# Altium PCB SOM_PCB.PcbDoc (part 3 of 5)
Units mil, origin at the board's own origin, x right, y up, seen from the top; angles counter-clockwise.
Board outline 6000 x 4000 mil, 8 copper layers (Top Layer, Int1 (Sign), Int2 (GND), Int3 (Sign), Int4 (Sign), Int5 (PWR), Int6 (Sign), Bottom Layer), stack 60.424 mil thick; 76 components, 194 nets, 972 pads, 571 vias.
Unrouted connection lines stored in the file: 54.
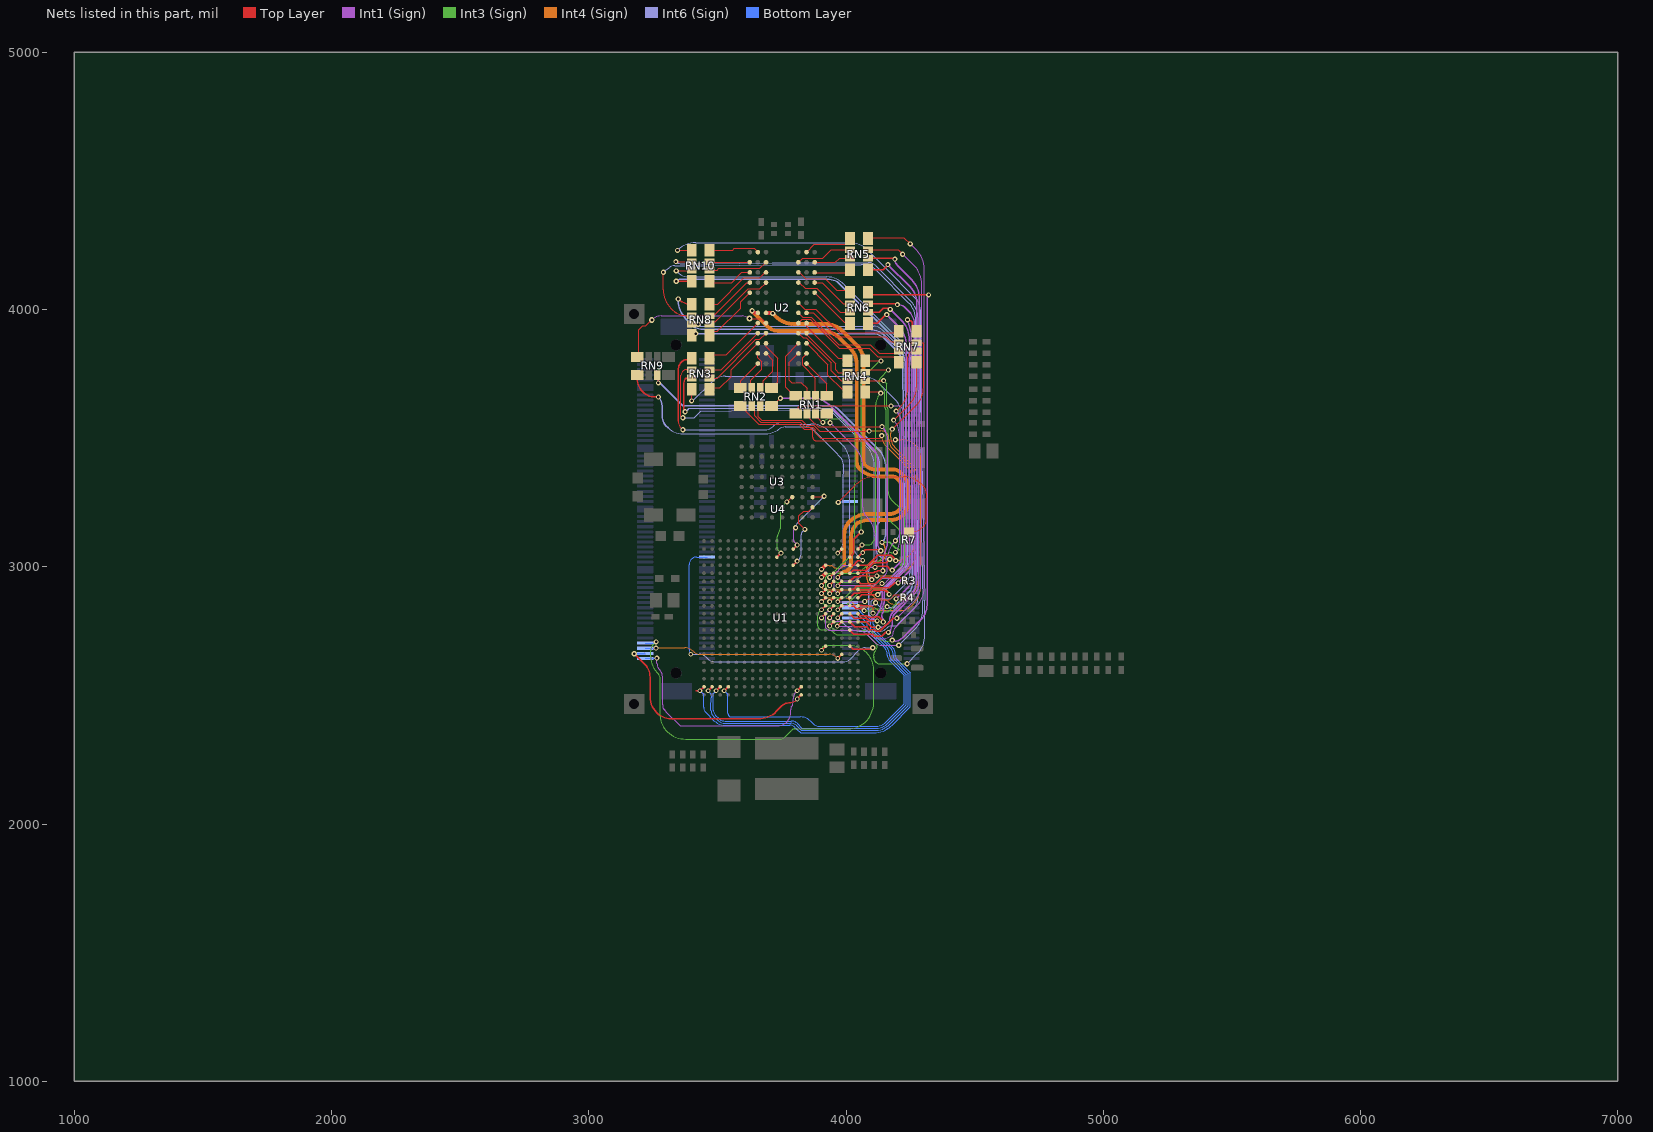
[diagram p8: the nets of this part, all layers, seen from the top]

## Via types
v1: diameter 19, hole 10, Top Layer to Bottom Layer, 330 vias
v2: diameter 20, hole 10, Top Layer to Bottom Layer, 235 vias
v3: diameter 23, hole 11.81, Top Layer to Bottom Layer, 6 vias

## Nets (pads, with @x,y where several pads share a name; then routed paths per layer and width w, separated by ;. In a path a pad name is that pad's centre, name@x,y a point inside that pad or via, vN(x,y) a via of type N, cw(c..) or ccw(c..) an arc to the next point about the centre after c; other vN are vias at no path point) (continued)
A\O\E\: U1.C10 U3.F6 | length 267.8
  Top Layer w4: v2(3770.25,3252) 3772.82,3255 3788.44,3270.63 U3.F6@3791.26,3270.63
  Top Layer w5: U1.C10@3731.5,3037.48 v1(3747.24,3053.23)
  Int3 (Sign) w3: 3741.65,3140 3734.24,3121.4 ccw(c3747.24,3116.22) 3733.25,3116.49 3732.37,3071 3732.37,3068.1 v1(3747.24,3053.23)
  Int3 (Sign) w4: 3741.65,3140 3744.85,3148.05 ccw(c3730,3154) 3745.99,3153.32 3746,3153.64 3746,3220 cw(c3767.11,3220) 3752.17,3234.92 cw(c3755.02,3232.11) 3752.28,3235.02 v2(3770.25,3252)
A\R\E\: U1.B12 U3.F8 | length 312
  Top Layer w4: U3.F8@3870,3270.63 3871.93,3272.56 3913.56,3272.56 v2(3915,3274)
  Top Layer w5: U1.B12@3794.49,3068.98 v1(3810.24,3084.72)
  Int1 (Sign) w3: 3796.24,3140 3796.24,3098.72 v1(3810.24,3084.72)
  Int1 (Sign) w4: 3796.24,3140 3796.24,3144.28 3801.31,3149.36 3801.8,3149.36 v2(3803.9,3151.46)
  Int6 (Sign) w4: v2(3803.9,3151.46) cw(c3831.52,3151.46) 3811.97,3170.97 ; 3811.99,3170.99 v2(3915,3274)
A\W\E\: U1.D12 U3.G8 | length 286.2
  Top Layer w4: v2(3840.32,3145.5) 3816.13,3169.69 3816.13,3197.9 3834.99,3216.76 3855.5,3216.76 U3.G8@3870,3231.26
  Top Layer w5: U1.D12@3794.49,3005.98 v1(3810.24,3021.73)
  Int6 (Sign) w3: v1(3810.24,3021.73) 3813.6,3025.09 ccw(c3783.69,3055) 3825.98,3055 3825.98,3125 cw(c3840.87,3125) 3830.34,3135.52 ; 3830.35,3135.53 v2@3834.82,3140
  Int6 (Sign) w4: v2@3834.82,3140 v2(3840.32,3145.5)
ATAPI_PDIAG: U1.P19 U4.134 | length 1269.4
  Top Layer w5: U1.P19@4014.96,2691.02 4027.46,2678.52 4096.45,2678.52 v2(4103.92,2685.45)
  Int6 (Sign) w3: v1(3396.5,2660) 3430,2660 cw(c3430,2623.79) 3455.61,2649.39 3461.23,2643.77 ccw(c3495,2677.53) 3495,2629.78 3614.78,2629.78 3615,2630 3990,2630 ccw(c3990,2666.21) 4015.61,2640.61 4050,2675 cw(c4075.22,2649.78) 4069.59,2685 cw(c4075.22,2649.78) 4075.22,2685.45 4080,2685.45
  Int6 (Sign) w4: 4080,2685.45 v2(4103.92,2685.45)
  Bottom Layer w3: v1@3395,2664.92 ccw(c3412.19,2678.95) 3396.5,2663.26 v1(3396.5,2660) ; 3395,3024.17 cw(c3419.91,3007.61) 3398.74,3028.74 ; 3398.78,3028.78 cw(c3419.91,3007.61) 3419.91,3037.52 U4.134@3459.88,3037.52
  Bottom Layer w4: v1@3395,2664.92 cw(c3412.19,2678.95) 3390,2678.95 3390,3007.61 cw(c3419.91,3007.61) 3395,3024.17
B\R\: R7.2 U4.76 | length 651.2
  Top Layer w4: v2(3969.73,3250.27) 4040.18,3320.71 cw(c4110.89,3250) 4110.89,3350 4223.58,3350 cw(c4223.58,3250) 4294.29,3320.71 4297.14,3317.86 cw(c4259.61,3280.32) 4300,3314.76 cw(c4259.61,3280.32) 4312.47,3285.21 4312.69,3266.43 ; R7.2@4245,3135.12 4252,3135.12 ccw(c4252,3203) 4300,3155 4301.4,3156.4 ccw(c4274.14,3183.66) 4312.44,3179.25 ccw(c4308.47,3179.78) 4312.47,3179.57 4312.68,3183.28 ccw(c4306.69,3183.66) 4312.69,3183.66 4312.69,3266.34 4312.69,3266.4
  Bottom Layer w4: v2(3969.73,3250.27) 3971.63,3252.16 4013.11,3252.16 U4.76@4015,3254.06
BMODE0: U1.W1 U4.60 | length 1519.2
  Top Layer w5: 3416.03,2517.8 v1(3432.28,2517.8) U1.W1@3448.03,2533.54
  Bottom Layer w3: v1(3432.28,2517.8) 3446.28,2503.8 3446.28,2455 ; U4.60@4015,2860.35 4040.59,2860.35 4055.94,2845 4075.51,2845 4080,2840.51
  Bottom Layer w4: 3446.28,2455 3446.28,2453.8 ccw(c3473.8,2453.8) 3454.34,2434.35 3486.79,2401.9 ccw(c3530,2445.11) 3530,2384 3781.55,2384 cw(c3781.55,2353.27) 3803.28,2375 3813.28,2365 3819.94,2358.34 ccw(c3828.01,2366.41) 3828.01,2355 4108.58,2355 ccw(c4108.58,2455) 4125.91,2356.51 cw(c4126.6,2352.57) 4126.1,2356.54 ccw(c4116.98,2433.02) 4161.17,2369.94 ; 4080,2840.51 4089,2831.51 4089,2802.31 4105,2786.31 4105,2775.57 4109,2771.57 4110,2770.57 4109.04,2769.61 4109.04,2758.42 4126.96,2740.5 4127.99,2740.5 4180.4,2688.09 cw(c4154.06,2661.74) 4191.31,2661.74 4191.31,2656.92 ccw(c4216.92,2656.92) 4198.79,2638.84 ; 4161.2,2369.96 cw(c4163.47,2366.66) 4161.36,2370.06 ccw(c4108.58,2455) 4179.29,2384.29 4250.1,2455.1 4250.1,2587.53 4198.81,2638.81
BMODE1: U1.W2 U4.59 | length 1429.2
  Top Layer w5: v1(3463.78,2517.8) U1.W2@3479.53,2533.54
  Bottom Layer w3: v1(3463.78,2517.8) 3475,2506.57 3476.27,2489.89 cw(c3462.32,2488.78) 3476.31,2488.18 3475,2455 ; U4.59@4015,2840.67 4040.59,2840.67 4055,2826.26 4055,2825 4080,2800
  Bottom Layer w4: 3475,2455 3475,2441.84 ccw(c3506.76,2441.84) 3484.29,2419.4 3498.74,2404.95 ccw(c3530,2436.21) 3530,2392 3784.87,2392 cw(c3784.87,2361.27) 3806.6,2383 3816.1,2373.5 3823.25,2366.34 ccw(c3828.91,2372) 3828.91,2364 4116.98,2364 ccw(c4116.98,2433.02) 4165.77,2384.21 4242.1,2460.53 4242.1,2584.21 4190.65,2635.67 cw(c4208.38,2653.38) 4183.31,2653.38 4183.31,2658.43 ccw(c4146.06,2658.43) 4172.4,2684.77 4124.68,2732.5 4123.65,2732.5 4097,2759.15 4097,2783 4080,2800
BMODE2: U1.W3 U4.58 | length 1380
  Top Layer w5: v1(3495.28,2517.8) U1.W3@3511.02,2533.54
  Bottom Layer w3: 3483.78,2455 3483.78,2506.3 v1(3495.28,2517.8) ; U4.58@4015,2820.98 4040.59,2820.98 4080,2781.57
  Bottom Layer w4: 3483.78,2455 3483.78,2443.11 ccw(c3512.48,2443.11) 3492.19,2422.81 3504.39,2410.61 ccw(c3530,2436.21) 3530,2400 3786.51,2400 cw(c3786.51,2340.36) 3792.35,2399.71 cw(c3791.93,2395.74) 3792.51,2399.69 cw(c3788.18,2369.27) 3809.91,2391 3828.91,2372 4116.98,2372 ccw(c4116.98,2433.02) 4160.13,2389.87 4234.1,2463.85 4234.1,2580.9 4178.91,2636.09 cw(c4205.25,2662.43) 4168,2662.43 ccw(c4130.75,2662.43) 4157.09,2688.77 4121.36,2724.5 4120.33,2724.5 4082.28,2762.55 4082.28,2779.3 4080,2781.57
BMODE3: U1.W4 U4.57 | length 1290.4
  Top Layer w5: v1(3526,2517.8) 3526.77,2517.8 U1.W4@3542.52,2533.54
  Int1 (Sign) w3: v1@3526,2517.02 v1(3526,2517.8)
  Bottom Layer w3: v1(3526,2517.8) 3526.77,2517.8 3540.77,2503.8 3540.77,2455 ; U4.57@4015,2801.3 4040.59,2801.3 4075.78,2766.11 4075.78,2757.74 4080,2753.52
  Bottom Layer w4: 3540.77,2455 3540.77,2430.05 ccw(c3554.82,2430.05) 3544.88,2420.12 ccw(c3554.82,2430.05) 3554.82,2416 3822.33,2416 cw(c3822.33,2357.96) 3863.35,2399.03 ; 3863.37,2399 3872.87,2389.5 ; 3872.89,2389.48 ccw(c3895.81,2412.43) 3895.81,2380 4115,2380 ccw(c4115,2437.8) 4155.87,2396.93 4226.1,2467.16 4226.1,2577.58 4169.34,2634.34 ; 4080,2753.52 4117.02,2716.5 4118.05,2716.5 4149.77,2684.77 cw(c4125.09,2660.09) 4160,2660.09 4160,2656.9 ccw(c4191.9,2656.9) 4169.32,2634.37
CAN0_RX: U1.R18 U4.153 | length 783.8
  Top Layer w5: v1(3967.72,2644) 3967.83,2644 3983.35,2659.53 U1.R18@3983.46,2659.53
  Int1 (Sign) w3: v1(3967.72,2644) v1@3968.28,2643.21
  Int4 (Sign) w3: 3395,2679.33 cw(c3372.48,2637.48) 3406.08,2671.08 ccw(c3432.84,2697.84) 3432.84,2660 3935,2660 cw(c3935,2620.17) 3963.16,2648.34 3967.5,2644 v1(3967.72,2644)
  Int4 (Sign) w4: v2(3261.47,2683.73) 3262.75,2685 3372.48,2685 cw(c3372.48,2637.48) 3395,2679.33
  Bottom Layer w4: U4.153@3219.72,2683.19 3220.63,2684.09 3260.59,2684.09 3260.96,2683.73 v2(3261.47,2683.73)
CAN0_TX: U1.P16 U4.154 | length 1713.4
  Top Layer w5: v1(3904.72,2675.28) U1.P16@3920.47,2691.02
  Int3 (Sign) w3: v1(3904.72,2675.28) cw(c3924.45,2675.28) 3924.45,2695 4008.51,2695 cw(c4008.51,2595) 4041.85,2689.28 cw(c4008.51,2595) 4080,2664.92
  Int3 (Sign) w4: v2(3262,2707.72) 3249.22,2694.94 ccw(c3271.49,2672.68) 3240,2672.68 3240,2650.36 ccw(c3325.36,2650.36) 3265,2590 cw(c3228.79,2553.79) 3277.3,2570.21 cw(c3273.5,2568.95) 3277.5,2568.97 cw(c3273.5,2568.95) 3277.5,2568.92 3277.5,2419.32 ccw(c3354.32,2419.32) 3300,2365 3305.71,2359.29 ccw(c3376.42,2430) 3376.42,2330 3740.76,2330 ccw(c3740.76,2362.18) 3763.51,2339.42 ccw(c3761.98,2343.12) 3764.81,2340.29 3789.43,2364.92 cw(c3801.71,2352.64) 3801.71,2370 4007.43,2370 ccw(c4007.43,2470) 4105.36,2449.76 ccw(c4007.43,2470) 4107.43,2470 4107.43,2609.66 ccw(c4008.51,2595) 4104.21,2624.01 ccw(c4008.51,2595) 4094,2646.87 ccw(c4008.51,2595) 4080,2664.92
  Bottom Layer w4: U4.154@3219.72,2702.87 v2@3257.87,2702.87
CAN1_RX: U1.W13 U4.151 | length 915
  Top Layer w5: v1(3810.24,2517.8) U1.W13@3825.98,2533.54
  Int1 (Sign) w3: 3786.82,2455 ccw(c3767.06,2474.75) 3793.89,2466.94 ccw(c3767.06,2474.75) 3795,2474.75 3795,2486.55 cw(c3833.64,2486.55) 3806.32,2513.88 v1(3810.24,2517.8)
  Int1 (Sign) w4: v2(3265,2645) 3265,2625.35 ccw(c3302.05,2625.35) 3275.83,2599.17 cw(c3249.65,2572.95) 3286.7,2572.95 3286.7,2464.37 ccw(c3318.03,2464.37) 3286.82,2461.63 cw(c3282.84,2461.28) 3286.81,2460.82 ccw(c3302.7,2458.96) 3286.7,2458.96 ccw(c3302.7,2458.96) 3291.51,2447.53 cw(c3288.71,2444.68) 3292.03,2446.91 ccw(c3318.03,2464.37) 3294.06,2444.21 ccw(c3318.03,2464.37) 3295.88,2442.23 3304,2433.37 3356.37,2381 3725,2381 ccw(c3725,2455.84) 3769.5,2395.67 ccw(c3732.09,2433.08) 3785,2433.08 3785,2444.04 cw(c3818.95,2444.04) 3786.82,2455
  Bottom Layer w4: U4.151@3219.72,2643.82 3262.15,2643.82 ccw(c3262.15,2647.85) v2(3265,2645)
CAN1_TX: U1.Y13 U4.152 | length 901.9
  Top Layer w5: v2(3176.75,2661.75) 3217.28,2621.22 cw(c3166.06,2570) 3238.5,2570 3238.5,2495 ccw(c3327.43,2495) 3264.55,2432.12 3265.66,2431.01 ; 3265.68,2430.99 ccw(c3320,2485.36) 3320,2408.5 3658.74,2408.5 ccw(c3658.74,2508.5) 3729.46,2437.79 3750.76,2459.09 cw(c3778.3,2431.55) 3778.3,2470.5 ccw(c3778.3,2511.54) 3801.9,2477.97 ccw(c3778.3,2511.54) 3807.32,2482.52 v1(3810.67,2485.87) ; v1@3810.24,2486.3 U1.Y13@3825.98,2502.05
  Bottom Layer w5: v2(3176.75,2661.75) 3217.97,2661.75 U4.152@3219.72,2663.5
DDR_A0: RN1.1 U1.G19 | length 1294.2
  Top Layer w4: RN1.1@3804.5,3595.5 3815,3606 3815,3620.5 3819.5,3625 v2(4175,3625) ; 4080,2924 4095.91,2924 4097.92,2926 4131,2926 v2(4140,2935)
  Top Layer w5: U1.G19@4014.96,2911.5 4016.16,2912.69 4029.46,2912.69 4040.77,2924 4080,2924
  Int1 (Sign) w4: v2(4140,2935) ccw(c4140,2961.88) 4158.99,2942.86 4185.88,2969.75 4215.57,2999.43 ccw(c4192.8,3022.2) 4225,3022.2 4225,3595 ccw(c4188.79,3595) 4217.08,3617.6 ccw(c4188.79,3595) 4214.39,3620.61 ccw(c4203.79,3610) 4203.79,3625 v2(4175,3625)
DDR_A1: RN1.3 U1.G17 | length 889
  Top Layer w4: RN1.3@3885,3578.4 3890.61,3578.4 3906.64,3562.38 v2(3910.11,3561.26)
  Top Layer w5: v1(3936.22,2895.75) U1.G17@3951.97,2911.5
  Int3 (Sign) w3: 3936.01,2972.7 ccw(c3936.3,2958.71) 3930.07,2971.24 ccw(c3936.3,2958.71) 3927.21,2969.35 cw(c3925.24,2971.61) 3926.97,2969.16 3926.77,2969.02 ccw(c3928.51,2966.57) 3926.33,2968.64 ccw(c3937.29,2958.3) 3922.22,2958.3 3922.22,2921.45 ccw(c3950.46,2921.45) 3930.49,2901.48 v1(3936.22,2895.75) ; 3936.04,2972.7 3941.38,2972.7 ccw(c3941.38,2985.06) 3942.95,2972.8 ccw(c3942.61,2975.79) 3944.18,2973.23 cw(c3970,2930.96) 3947.41,2975.04 ; 3947.44,2975.05 cw(c3970,2930.96) 3950.12,2976.32 ccw(c3938.87,2996.33) 3955.1,2980.1 4023.39,3048.39 ccw(c3977.84,3094.02) 4027.66,3053.1 4027.71,3053.16 4027.88,3053.36 ccw(c3985.79,3077.58) 4033.46,3068.35 4034.77,3075.08 4034.77,3075.47 4034.85,3140
  Int3 (Sign) w4: v2(3910.11,3561.26) 3914.4,3565.4 cw(c3940,3539.79) 3940,3576 3975,3576 cw(c3975,3554.27) 3990.36,3569.64 4025,3535 cw(c4000.23,3510.23) 4035.26,3510.23 4035.26,3510 4034.85,3140
DDR_A2: RN1.2 U1.E20 | length 968.1
  Top Layer w4: RN1.2@3859.93,3578.22 3859.93,3576.38 3892.31,3544 3909.97,3544 3938.09,3543.91 4128.04,3544.02 ccw(c4128.04,3548.03) v2@4130.82,3545.15 ; v2@4130.84,3545.17 4132.61,3546.94 4135.06,3546.94 v2@4136,3546
  Top Layer w5: U1.E20@4046.46,2974.49 4048.47,2976.5 4108.17,2976.5 4112.54,2980.87 4119.46,2980.87 4123.59,2985 4142.85,2985 v2(4143.5,2984.35) ; v2@4136,3546 4137,3545 v2(4140,3545)
  Int1 (Sign) w5: v2(4140,3545) cw(c4090.51,3495.51) 4155.37,3521.81 cw(c4090.51,3495.51) 4160.5,3495.51 4160.5,3088.12 cw(c4107.58,3088.12) 4160.36,3084.3 cw(c4107.58,3088.12) 4157.4,3070.28 cw(c4152.71,3072) 4157.31,3070.04 4143.9,3038.56 ccw(c4148.5,3036.6) 4143.5,3036.6 v2(4143.5,2984.35)
DDR_A3: RN1.4 U1.G18 | length 925.6
  Top Layer w4: RN1.4@3925.5,3595.5 3938.13,3582.87 3938.13,3560.24 v2(3938.14,3559.91)
  Top Layer w5: v1(3967.72,2895.75) U1.G18@3983.46,2911.5
  Int1 (Sign) w3: v1(3967.72,2895.75) 3953.72,2909.75 3953.72,2968.72 3990,3005 4073.28,3005 ccw(c4073.28,3069.16) 4080,3005.35
  Int1 (Sign) w4: v2(3938.14,3559.91) 4035.71,3462.34 cw(c3965,3391.63) 4065,3391.63 4065,3231.21 ccw(c4116.21,3231.21) 4079.99,3195.01 4083.72,3191.28 cw(c4017.44,3125) 4108.59,3146.86 cw(c4017.44,3125) 4110.61,3135.29 ccw(c4114.59,3135.71) 4110.61,3135.22 4111.46,3130.88 ; 4080,3005.35 ccw(c4073.28,3069.16) 4117.87,3023.02 4118.05,3023.26 ccw(c4114.87,3025.69) 4118.7,3024.54 4118.89,3025.16 cw(c4122.72,3024.01) 4119.27,3026.03 ccw(c4107.91,3032.54) 4119.22,3039.12 cw(c4145.06,3054.01) 4115.24,3054.01 ; 4111.46,3130.87 cw(c4107.53,3130.11) 4111.5,3130.6 4112.47,3123.15 cw(c4050.37,3115.03) 4112.85,3119.38 4112.94,3118.13 cw(c4108.95,3117.83) 4112.95,3117.99 4113.51,3103.22 4115.24,3054.21 cw(c4111.24,3054.04) 4115.24,3054.04
DDR_A4: RN2.1 U1.G16 | length 1802.3
  Top Layer w4: RN2.1@3589.5,3625.5 3595,3625.5 3612,3608.5 3612,3603 3660.5,3554.5 3818.27,3554.5 3837.77,3535 3862,3535 cw(c3862,3526.34) 3870.66,3526.34 3870.66,3504.34 ccw(c3885,3504.34) 3885,3490 4188.8,3490 4192,3493.2 v2(4192,3494)
  Top Layer w5: v1(3904.82,2896.13) U1.G16@3920.47,2911.5
  Int4 (Sign) w3: v1(3904.82,2896.13) 3920.95,2880 3990.25,2880 cw(c3990.25,2844.39) 4015.41,2869.59 ; 4015.43,2869.57 4025.86,2859.14 ; 4025.88,2859.12 ccw(c4060,2893.28) 4030.58,2855 ccw(c4060,2893.28) 4060,2845 4080,2845
  Int4 (Sign) w4: 4080,2845 4092.63,2845 cw(c4092.63,2807.05) 4109.01,2841.28 cw(c4092.63,2807.05) 4119.46,2833.89 ccw(c4128.84,2843.27) 4128.84,2830 4153.73,2830 cw(c4153.76,2826) 4155,2829.8 ccw(c4160,2845) 4165,2829.8 cw(c4166.24,2826) 4166.27,2830 4212.19,2830 ccw(c4212.19,2888.03) 4238.42,2836.27 ccw(c4212.19,2888.03) 4253.23,2847 4261.06,2854.84 ccw(c4190.35,2925.55) 4290.35,2925.55 4290.35,3420.46 ccw(c4215.81,3420.46) 4268.56,3473.13 ccw(c4215.81,3420.46) 4268.52,3473.17 ccw(c4218.22,3422.87) 4218.22,3494 v2(4192,3494)
DDR_A5: RN2.3 U1.F19 | length 1394
  Top Layer w4: RN2.3@3666.3,3625.5 3659,3618.2 3659,3583.37 3671.87,3570.5 3828,3570.5 3847.5,3551 3873.96,3551 3884.96,3540 ; 3885,3540 3898.91,3526.09 4088.82,3526.09 v2(4090,3527.27) ; 4080,2966 4118.4,2966 v2(4120.02,2964.38)
  Top Layer w5: U1.F19@4014.96,2942.99 4033.96,2961.99 4051.63,2961.99 4055.65,2966 4080,2966
  Int4 (Sign) w4: v2(4090,3527.27) 4090.73,3528 4135,3528 cw(c4135,3493.08) 4159.69,3517.77 cw(c4145.74,3503.82) 4162.14,3514.79 cw(c4145.74,3503.82) 4165.47,3503.82 4165.47,3495.35 ccw(c4215.35,3495.35) 4180.08,3460.08 4245.06,3395.09 cw(c4174.35,3324.38) 4274.35,3324.38 4274.35,3051.72 cw(c4208.28,3051.72) 4255,3005 4244.29,2994.29 cw(c4173.58,3065) 4173.58,2965 4120.64,2965 v2(4120.02,2964.38)
DDR_A6: RN2.2 U1.D20 | length 1336.8
  Top Layer w4: RN2.2@3633.65,3625.5 3644.65,3614.5 3644.65,3586.41 3668.56,3562.5 3821.59,3562.5 3841.09,3543 3870.39,3543 3880.61,3532.78 3880.61,3520.95 3901.55,3500 4128.5,3500 ccw(c4128.5,3510) 4138.5,3510 4138.65,3509.85 v2(4138.87,3509.85)
  Top Layer w5: U1.D20@4046.46,3005.98 4084.32,3005.98 4123.83,3045.5 4176.83,3045.5 4186.5,3035.83 4186.5,3035.02 4193.47,3028.05 v2(4193.47,3023.99)
  Int4 (Sign) w4: v2(4138.87,3509.85) 4138.87,3508.94 ccw(c4193.94,3508.94) 4138.91,3506.97 ccw(c4193.94,3508.94) 4148.5,3477.83 ccw(c4193.94,3508.94) 4154.99,3470.01 4237.06,3387.94 cw(c4166.35,3317.23) 4266.35,3317.23 4266.35,3082 cw(c4228.57,3082) 4265,3071.98 cw(c4228.57,3082) 4255.31,3055.31 4245.57,3045.57 cw(c4193.47,3097.67) v2(4193.47,3023.99)
DDR_A7: RN2.4 U1.C20 | length 991.8
  Top Layer w4: RN2.4@3710.5,3625.5 3716,3625.5 3745,3654.5 v2(3745,3655)
  Top Layer w5: U1.C20@4046.46,3037.48 4063.98,3055 v1(4065,3055) ; v1@4064.49,3055.51 4075.48,3066.5 4126.41,3066.5 4131.04,3063.01 4134.18,3062.21 v2(4135.25,3062.06)
  Int1 (Sign) w5: v2(3745,3655) 3868.58,3655 cw(c3868.58,3555) 3939.29,3625.71 4096.22,3468.78 cw(c4025.51,3398.07) 4104.39,3459.53 cw(c4060.07,3415.2) 4122.18,3423.66 cw(c4060.07,3415.2) 4122.75,3415.2 4122.75,3098.18 4123.5,3088.17 4123.5,3084.88 ccw(c4128.5,3084.88) 4123.86,3083.02 4123.88,3082.96 4131.14,3065.06 4134.02,3062.77 v2(4135.25,3062.06)
DDR_A8: RN3.4 U1.F18 | length 1842.2
  Top Layer w4: v2(3400,3645) 3400,3679 3395,3684 RN3.4@3400.5,3689.5
  Top Layer w5: v1(3967.72,2926) 3967.72,2927.24 U1.F18@3983.46,2942.99
  Int1 (Sign) w3: v1(3967.72,2926) 3968.96,2927.24 4080,2927.24
  Int1 (Sign) w4: 4080,2927.24 4094.81,2927.24 ccw(c4094.81,2962.99) 4120.09,2937.72 4133.37,2951 4133.63,2951 4153.81,2971.19 ccw(c4136.46,2988.54) 4161,2988.54 4161,3013.77 ccw(c4157,3013.8) 4159.6,3016.84 cw(c4170,3029) 4154,3029 cw(c4170,3029) 4154.01,3029.5 ; 4154.01,3029.53 cw(c4170,3029) 4160.65,3041.98 ccw(c4158.31,3045.23) 4162.26,3044.6 cw(c4261,3028.77) 4169.78,3069.75 cw(c4261,3028.77) 4189.28,3098.46 cw(c4261,3028.77) 4190.29,3099.48 v2(4192,3101.19)
  Int6 (Sign) w4: v2(3400,3645) 3405,3645 3480,3720 cw(c3530.7,3669.3) 3530.7,3741 4058.58,3741 cw(c4058.58,3641) 4129.29,3711.71 4196.83,3644.17 4196.9,3644.1 cw(c4162.72,3610) 4211,3610 4211,3145 cw(c4151.1,3145) 4193.46,3102.64 v2(4192,3101.19)
DDR_A9: RN3.3 U1.E19 | length 1632.7
  Top Layer w5: v2(3374.5,3602.89) 3374.5,3606.95 3370,3611.45 3370,3715.2 cw(c3393.66,3715.2) 3375.18,3729.97 ; 3376.93,3731.93 ccw(c3393.66,3715.2) 3375.18,3729.97 ; U1.E19@4014.96,2974.49 4027.46,2986.99 4078.05,2986.99 4107.56,3016.5 4156.5,3016.5 4169,3029 v2(4170,3029) ; 3375.18,3729.97 cw(c3386.1,3715.82) 3378.35,3731.93 3398.73,3731.93 RN3.3@3400.5,3733.7 3384.18,3733.7 ccw(c3384.18,3720.97) 3375.18,3729.97
  Int6 (Sign) w5: v2(3374.5,3602.89) 3376.02,3602.89 3386.17,3613.04 3387.63,3614.5 3674.82,3616 cw(c3675,3591.5) 3675.17,3616 3925,3614.61 3930.17,3614.61 cw(c3930.17,3580.17) 3931.78,3614.57 cw(c3930.17,3580.17) 3954.52,3604.52 4109.46,3449.58 cw(c4059.89,3400) 4130,3400 4130,3179.66 cw(c4116.34,3179.66) 4126,3170 ccw(c4144.11,3151.89) 4118.5,3151.89 4118.5,3077.43 4118.5,3075 4118.5,3064.31 ccw(c4145.14,3064.31) 4126.3,3045.48 ; 4126.3,3045.47 4130.72,3041.06 ccw(c4170,3099.01) v2(4170,3029)
DDR_A10: RN4.1 U1.B20 | length 718.3
  Top Layer w4: RN4.1@4074.5,3679.5 4130.5,3679.5 v2(4135,3675)
  Top Layer w5: U1.B20@4046.46,3068.98 v1(4062.2,3084.72)
  Int3 (Sign) w3: v1(4062.2,3084.72) 4080,3084.72
  Int3 (Sign) w4: 4080,3084.72 4087.26,3084.72 ccw(c4087.26,3102.74) 4100,3090 ccw(c4061.37,3128.63) 4116,3128.63 4116,3630 cw(c4178.77,3630) v2@4134.36,3674.36 ; v2@4134.38,3674.38 v2(4135,3675)
DDR_A11: RN3.2 U1.F17 | length 1741
  Top Layer w4: v2(3366,3579.33) 3364.11,3579.33 3358.5,3584.95 3358.5,3743.5 3358.5,3744.31 cw(c3380.69,3744.31) 3365,3760 cw(c3380.33,3744.67) 3380.33,3766.35 RN3.2@3400.5,3766.35 RN3.2@3399.15,3765
  Top Layer w5: v1(3936.22,2927.24) U1.F17@3951.97,2942.99
  Int3 (Sign) w3: v1(3936.22,2927.24) 3937.65,2928.67 cw(c3965,2901.32) 3965,2940 4012.32,2940 ccw(c4012.32,2982.68) 4042.5,2952.5 4046.16,2956.16 ; 4046.18,2956.18 cw(c4067.5,2934.82) 4067.5,2965 cw(c4067.5,2922.75) 4080,2963.11
  Int3 (Sign) w4: 4080,2963.11 cw(c4067.5,2922.75) 4097.37,2952.63 v2(4100,2950)
  Int6 (Sign) w4: v2(3366,3579.33) 3366.05,3579.28 3409.28,3579.28 3434.83,3604.83 3674.81,3607.5 cw(c3675,3591.5) 3675.13,3607.5 3925.01,3606.09 cw(c3925.01,3567.65) 3925.44,3606.09 cw(c3925.01,3567.65) 3952.17,3594.85 ; 3952.19,3594.83 4051.01,3496.01 4080.71,3466.31 cw(c4010,3395.6) 4081.01,3466.01 cw(c4010,3395.6) 4110,3395.6 4110,3042.91 cw(c4066.77,3042.91) 4103.29,3019.78 cw(c4066.77,3042.91) 4097.34,3012.35 ccw(c4142.1,2982.62) 4088.37,2982.62 4088.37,2978.09 ccw(c4128.09,2978.09) v2(4100,2950)
DDR_A12: RN3.1 U1.D19 | length 1503.2
  Top Layer w4: 3347.66,3565 ccw(c3381.3,3565) 3357.52,3541.22 v2(3366.03,3532.7)
  Top Layer w5: 3347.66,3565 3347.66,3765 cw(c3390.31,3765) 3350.63,3780.63 cw(c3390.31,3765) 3360.16,3795.15 3363.91,3798.91 cw(c3378.61,3784.21) 3378.61,3805 3387.22,3805 ccw(c3387.22,3823.78) RN3.1@3400.5,3810.5 ; U1.D19@4014.96,3005.98 4015.64,3006.67 4029.46,3006.67 4046.65,3023.85 4063.85,3023.85 v1(4065,3025)
  Int6 (Sign) w3: 4015,3140 4015,3116.42 ccw(c4115,3116.42) 4044.29,3045.71 v1(4065,3025)
  Int6 (Sign) w4: v2(3366.03,3532.7) 3685.3,3532.7 ccw(c3685.3,3574.7) 3715,3545 cw(c3739.14,3520.86) 3739.14,3555 3863.58,3555 cw(c3863.58,3455) 3870.22,3554.78 cw(c3863.58,3455) 3916.26,3540 cw(c3863.58,3455) 3934.29,3525.71 3985.71,3474.29 cw(c3915,3403.58) 4015,3403.58 4015,3140
DDR_BA0: RN4.3 U1.H17 | length 1262.2
  Top Layer w4: RN4.3@4074.5,3756.3 4083.2,3765 v2(4165,3765)
  Top Layer w5: v1(3936.22,2864.25) U1.H17@3951.97,2880
  Int3 (Sign) w3: v1(3936.22,2864.25) 3944.09,2872.13 cw(c3963.1,2853.12) 3963.1,2880 3982.19,2880 ccw(c3982.19,2912.81) 4005.38,2889.6 4027.02,2911.24 cw(c4045,2893.26) 4045,2918.69 4080,2918.69
  Int3 (Sign) w4: 4080,2918.69 4140.08,2919 ccw(c4140.08,2934.8) 4151.26,2923.63 4163.81,2936.19 4206.32,2978.7 ccw(c4185.34,2999.66) 4215,2999.66 4215,3120.86 ccw(c4180.86,3120.86) 4205.02,3144.98 4165,3185 cw(c4186.73,3206.73) 4156,3206.73 4156,3538.37 4156,3608.4 ccw(c4152,3608.4) 4154.81,3611.25 cw(c4164,3620.44) 4151,3620.38 4151,3676.02 ccw(c4119.67,3676.02) 4141.82,3698.18 4132.65,3707.35 cw(c4141.45,3716.16) 4129,3716.16 4129,3721.31 cw(c4133,3721.31) 4129.18,3722.51 4131.04,3728.46 cw(c4146.31,3723.69) 4133.66,3733.47 4134.12,3734.07 cw(c4137.29,3731.63) 4134.45,3734.45 v2(4165,3765)
DDR_BA1: RN4.2 U1.H16 | length 1241.5
  Top Layer w4: RN4.2@4074.5,3723.65 4143.65,3723.65 v2(4146.31,3723.69)
  Top Layer w5: v1(3904.72,2864.25) U1.H16@3920.47,2880
  Int3 (Sign) w3: v1(3904.72,2864.25) 3912.6,2856.38 ; 3912.61,2856.36 ccw(c3931.61,2875.39) 3931.61,2848.5 3990,2848.5 ccw(c3990,2873.22) 4007.46,2855.73 4055.95,2904.22 cw(c4071.12,2889.05) 4071.12,2910.5 4080,2910.5
  Int3 (Sign) w4: 4080,2910.5 4135,2910.5 ccw(c4135,2954.33) 4138.86,2910.67 ccw(c4138.86,2945.59) 4139.91,2910.69 ccw(c4138.86,2945.59) 4152.3,2913.36 ccw(c4138.86,2945.59) 4163.55,2920.9 4216.33,2973.67 ; v2(4146.31,3723.69) 4157.81,3712.19 cw(c4155,3709.34) 4158.92,3710.14 4159,3709.76 4159,3621.92 ccw(c4167.57,3621.92) 4161.5,3615.87 cw(c4155.46,3609.84) 4164,3609.84 4164,3535.06 4164,3291.04 ccw(c4206.04,3291.04) 4176.29,3261.34 ; 4176.31,3261.31 4213.81,3223.81 cw(c4179.56,3189.56) 4228,3189.56 4228,3001.85 cw(c4188.15,3001.85) 4216.35,2973.7
DDR_D0: RN5.4 U1.L18 | length 2018.5
  Top Layer w4: RN5.4@4085,4276 4089,4280 4225,4280 v2(4250,4255)
  Top Layer w5: v1(3965.84,2769.08) 3966.52,2769.76 3967.72,2769.76 U1.L18@3983.46,2785.51
  Int1 (Sign) w3: v1(3965.84,2769.08) 4021.97,2769.08 cw(c4021.97,2669.08) 4080,2750.52
  Int1 (Sign) w4: 4080,2750.52 cw(c4021.97,2669.08) 4092.68,2739.8 4100.59,2731.88 ccw(c4129.28,2760.57) 4129.28,2720 4149.64,2720 ccw(c4149.64,2724) 4151.17,2720.3 4178.16,2731.5 ccw(c4176.64,2735.2) 4179.46,2732.36 4181.46,2734.36 ccw(c4153.88,2746.48) 4184,2746.48 cw(c4208.51,2746.48) 4184.78,2752.62 cw(c4208.51,2746.48) 4191.17,2763.8 ; 4191.18,2763.81 4275.21,2847.84 ccw(c4204.5,2918.55) 4275.71,2848.34 ccw(c4204.5,2918.55) 4304.5,2918.41 ccw(c4204.5,2918.55) 4304.5,2918.55 4304.5,4159.08 ccw(c4204.5,4159.08) 4275.21,4229.79 v2(4250,4255)
DDR_D1: RN5.2 U1.M19 | length 1799.1
  Top Layer w5: U1.M19@4014.96,2754.02 4030.98,2738 4103.21,2738 4110.71,2730.5 4139.29,2730.5 4153.79,2745 v2(4165,2745) ; RN5.2@4085,4199.15 4175.85,4199.15 4176.13,4198.87 4187.13,4198.87 v2(4190,4196)
  Int1 (Sign) w5: v2(4165,2745) ccw(c4127.58,2782.42) 4180.5,2782.42 4180.5,2794.59 cw(c4214.88,2794.59) 4190.56,2818.89 4265.83,2894.17 ccw(c4225.59,2934.41) 4282.5,2934.41 4283,2973.76 4285,3661.84 4285,4045.24 ccw(c4185,4045.24) 4255.71,4115.95 4200.14,4171.53 cw(c4224.61,4196) v2(4190,4196)
DDR_D2: RN5.3 U1.L19 | length 1838.2
  Top Layer w4: RN5.3@4085,4231.8 4203.2,4231.8 v2(4220,4215)
  Top Layer w5: U1.L19@4014.96,2785.51 4033.96,2766.52 4079.83,2766.52 4090.34,2756 4110.67,2756 4118.17,2748.5 4131.83,2748.5 4183.33,2800 v2(4197.84,2800)
  Int1 (Sign) w4: v2(4197.84,2800) 4265.92,2868.09 ccw(c4205.38,2928.63) 4291,2928.63 4295,3242.67 4295,4098.58 ccw(c4195,4098.58) 4265.71,4169.29 v2(4220,4215)
DDR_D3: RN5.1 U1.L20 | length 1704.5
  Top Layer w5: U1.L20@4046.46,2785.51 4079.38,2785.51 4099.85,2765.04 v2(4125.04,2765.04) ; RN5.1@4085,4155 4143.94,4155 4161.34,4172.4 v2(4162.69,4174.69)
  Int1 (Sign) w5: v2(4125.04,2765.04) 4132.06,2765.04 ccw(c4132.06,2804.44) 4159.92,2776.58 ; 4159.93,2776.6 ccw(c4131.95,2804.55) 4171.5,2804.55 4171.5,2805.68 ; v2(4162.69,4174.69) 4249.71,4087.67 cw(c4188.66,4026.61) 4275,4026.61 4275,3666.56 4274,2977.49 4273.5,2940.34 cw(c4211.26,2940.34) 4255.27,2896.33 4181.36,2822.42 ccw(c4208.78,2795) 4171.5,2805.68 ; 4170,2795 cw(c4208.78,2795) 4171.5,2805.68
DDR_D4: RN6.4 U1.L17 | length 1941.9
  Top Layer w5: v1(3936.22,2769.76) U1.L17@3951.97,2785.51 ; RN6.4@4085,4066.85 4094.7,4057.15 v2(4321,4057.15)
  Int1 (Sign) w5: v2(4180.03,2714.89) 4185.64,2710.75 4188.07,2710.09 ccw(c4185,2760.93) 4221.01,2724.92 4291.71,2795.62 ccw(c4235.49,2851.84) 4315,2851.84 4315,4047.09 4321,4053.09 v2(4321,4057.15)
  Int3 (Sign) w3: v1(3936.22,2769.76) v1@3939.22,2766.77 ; v1@3939.23,2766.76 ccw(c3970,2797.55) 3970,2754.02 4075.47,2754.02 cw(c4075.47,2704.48) 4080,2753.81
  Int3 (Sign) w4: 4080,2753.81 cw(c4075.47,2704.48) 4110.49,2739.51 4125,2725 ccw(c4161.21,2761.21) 4161.21,2710 ccw(c4161.21,2714) 4162.25,2710.14 v2(4180.03,2714.89)
DDR_D5: RN6.3 U1.K16 | length 1684.5
  Top Layer w5: v1(3904.72,2801.26) U1.K16@3920.47,2817.01 ; RN6.3@4085,4022.65 4197.07,4022.65 4197.07,4021.93 v2(4200,4019)
  Int1 (Sign) w5: v2(4195,2875) 4239.39,2919.39 ccw(c4177.57,2981.21) 4265,2981.21 4265,3945 ccw(c4198.31,3945) 4245.47,3992.16 4231.79,4005.83 ccw(c4200,3974.04) v2(4200,4019)
  Int3 (Sign) w3: v1(3904.72,2801.26) 3912.6,2793.39 ; 3912.61,2793.37 ccw(c3931.61,2812.4) 3931.61,2785.51 4080,2785.51
  Int3 (Sign) w4: 4080,2785.51 4093.14,2785.51 4133.63,2826 4163.63,2826 4195,2857.37 v2(4195,2875)
DDR_D6: RN6.2 U1.K20 | length 1494.7
  Top Layer w5: U1.K20@4046.46,2817.01 4053.2,2810.26 4081.41,2810.26 4088.17,2803.5 4111.83,2803.5 4114.17,2805.83 4127.83,2805.83 4143.45,2790.21 v2(4144.75,2785.38) ; RN6.2@4085,3990 4130,3990 4145,4005 4168.99,4005 4168.99,4003.34 v2(4171.92,4000.42)
  Int1 (Sign) w5: v2(4144.75,2785.38) 4144.75,2794.82 ccw(c4139.75,2794.85) 4143.29,2798.37 cw(c4155,2810) 4143.29,2821.63 ccw(c4139.75,2825.15) 4144.75,2825.15 4144.75,2837.78 ccw(c4139.75,2837.78) 4144.46,2839.46 cw(c4160,2845) 4143.5,2844.84 cw(c4160,2845) 4146.05,2853.81 ccw(c4134.16,2861.21) 4148.03,2859.3 ccw(c4040,2873.79) 4149,2873.79 4149,2900.17 cw(c4168.59,2900.14) 4156.03,2915.17 ccw(c4140,2935) 4159.73,2918.85 4193.13,2952.25 4235.44,2994.56 ccw(c4212.37,3017.63) 4245,3017.63 4245,3892.56 ccw(c4161.06,3892.56) 4220.42,3951.92 v2(4171.92,4000.42)
DDR_D7: RN6.1 U1.K17 | length 1543.4
  Top Layer w5: v1(3936.22,2801.26) U1.K17@3951.97,2817.01 ; RN6.1@4085,3945.85 4120.85,3945.85 4155,3980 v2(4158.5,3980)
  Int1 (Sign) w3: v1(3936.22,2801.26) 3950.22,2787.26 4074.81,2787.26 ccw(c4074.81,2832.67) 4080,2787.56
  Int1 (Sign) w5: 4080,2787.56 ccw(c4074.81,2832.67) 4106.92,2800.56 4110.99,2804.62 ; 4110.99,2804.63 ccw(c4105,2820) 4120.37,2814.01 cw(c4125.03,2812.2) 4120.98,2815.13 ccw(c4040,2873.79) 4134.2,2840.24 ccw(c4129.5,2841.94) 4134.5,2841.97 4134.5,2844.87 ; 4134.5,2844.88 cw(c4160,2845) 4138.4,2858.55 ccw(c4134.16,2861.21) 4139.12,2860.53 ccw(c4040,2873.79) 4140,2873.79 4140,2900.14 cw(c4168.59,2900.14) 4150.33,2922.14 ccw(c4140,2935) 4152.86,2924.66 cw(c4156.76,2921.53) 4153.23,2925.07 4173.22,2945.06 4189.37,2961.22 4221.54,2993.38 ccw(c4189.13,3025.84) 4235,3025.84 4235,3862.08 ccw(c4135,3862.08) 4205.71,3932.79 v2(4158.5,3980)
DDR_D8: RN8.4 U1.K19 | length 2092.5
  Top Layer w5: RN8.4@3400.5,3899.5 3407.34,3906.34 v2(3415.83,3906.34) ; U1.K19@4014.96,2817.01 4032.47,2799.5 4079.44,2799.5 4089.44,2789.5 4120.83,2789.5 v2(4121,2789.33)
  Int6 (Sign) w5: v2(3415.83,3906.34) 3421.46,3906.34 3421.8,3906 4103.09,3906 cw(c4103.09,3838.09) 4151.11,3886.11 4196.08,3841.13 cw(c4134.96,3780.01) 4196.15,3841.07 cw(c4134.96,3780.01) 4221.38,3781.63 cw(c4134.96,3780.01) 4221.4,3780.01 4228.17,3054.98 4228.17,3032.19 cw(c4177.81,3032.19) 4213.42,2996.58 4171.84,2955 4136.67,2955 4088.5,2906.83 4088.5,2813.17 4106.21,2795.46 ccw(c4121,2810.25) v2(4121,2789.33)
DDR_D9: RN8.3 U1.J20 | length 2044.8
  Top Layer w4: 4085.96,2849.04 4095.96,2849.04 4105,2840 v2(4105,2820)
  Top Layer w5: U1.J20@4046.46,2848.5 4047.95,2850 4063.08,2850 4064.04,2849.04 4085.96,2849.04
  Int6 (Sign) w4: v2(3425.7,3942.51) 3429.5,3939.83 3434.33,3935 4107.14,3935 cw(c4107.14,3887.14) 4140.96,3921.01 4220.98,3840.98 cw(c4176.82,3796.82) 4238.85,3804.08 cw(c4176.82,3796.82) 4239.27,3796.82 4239.27,3774.99 4248.5,3014.65 4248.72,2974.99 4248.72,2972.17 cw(c4197.83,2972.17) 4233.81,2936.19 4191.63,2894 4191.37,2894 4179,2881.63 4173.37,2876 4121.63,2876 4108.37,2876 4099,2866.63 4099,2826 v2(4105,2820)
DDR_D10: RN8.2 U1.K18 | length 2877.8
  Top Layer w4: v2(3290,4145) 3290,4076.17 ccw(c3390,4076.17) 3319.29,4005.46 3327.1,3997.65 ; 3327.13,3997.62 ccw(c3378.52,4049.08) 3342.86,3985.7 ; 3334.91,3989.84 ccw(c3385.07,4076.35) 3342.86,3985.7 ; RN8.2@3400.5,3976.35 RN8.2@3385.07,3976.35 ; 3342.86,3985.7 ccw(c3385.07,4076.35) RN8.2@3385.07,3976.35 ; 3342.86,3985.7 ccw(c3378.52,4049.08) 3378.52,3976.35 RN8.2@3385.07,3976.35
  Top Layer w5: v1(3967.72,2801.26) U1.K18@3983.46,2817.01
  Int6 (Sign) w3: v1(3967.72,2801.26) 3990.69,2778.29 ccw(c4061.4,2849) 4061.4,2749 4080,2749
  Int6 (Sign) w4: v2(3290,4145) 3293.76,4148.76 3312.92,4162.6 cw(c3334.14,4135.86) 3334.13,4170 3448.32,4169.78 3454.95,4169.78 3461.06,4169.89 3713.25,4174.69 3719.85,4174.81 4060.11,4174.81 cw(c4060.11,4090.11) 4120,4150 4242.71,4027.29 cw(c4172,3956.58) 4272,3956.58 4272,3683.59 4278.63,2879.99 4278.63,2871.1 cw(c4233.9,2871.1) 4265.54,2839.48 4203.88,2777.82 cw(c4185,2796.7) 4185,2770 4180.1,2770 ccw(c4180.1,2739.27) 4158.37,2761 cw(c4129.4,2789.97) 4129.4,2749 4080,2749
DDR_D11: RN8.1 U1.H20 | length 2103
  Top Layer w5: v2(3347.97,4040.9) ccw(c3397.23,4090.16) 3397.23,4020.5 RN8.1@3400.5,4020.5 ; U1.H20@4046.46,2880 4048.7,2880 4060.7,2892 v2(4123.5,2892)
  Int6 (Sign) w5: v2(3347.97,4040.9) 3347.97,4035.12 ccw(c3447.97,4035.12) 3377.26,3964.41 3403.33,3938.33 ccw(c3441.56,3976.56) 3441.56,3922.5 4088.51,3922.5 cw(c4088.51,3828.51) 4154.93,3895.01 cw(c4088.51,3828.51) 4154.97,3894.97 4209.97,3839.97 cw(c4160.21,3790.21) 4210.03,3839.91 cw(c4160.21,3790.21) 4230.35,3795.94 cw(c4160.21,3790.21) 4230.58,3790.21 4230.58,3775.01 4238.9,3029.99 4238.9,3019.9 cw(c4205.1,3019.9) 4229,2996 4125,2892 v2(4123.5,2892)
DDR_D12: RN10.4 U1.J19 | length 2289.2
  Top Layer w5: v2(3340,4110) 3340.5,4109.5 RN10.4@3400.5,4109.5 ; U1.J19@4014.96,2848.5 4016.16,2847.31 4029.46,2847.31 4040.77,2836 4064,2836 v1(4070.68,2829.32)
  Int3 (Sign) w3: v1(4070.68,2829.32) v1@4080,2829.32
  Int3 (Sign) w4: v1@4080,2829.32 4091.69,2829.32 4098.37,2836 4151,2836 v2(4160,2845)
  Int6 (Sign) w5: v2(3340,4110) cw(c3360.52,4089.48) 3347.18,4115.25 cw(c3360.52,4089.48) 3360.52,4118.5 3925.58,4118.5 cw(c3925.58,4043.85) 3978.36,4096.64 4230,3845 cw(c4168.44,3783.44) 4255.5,3783.44 4255.5,3676.76 4258.5,2959.21 4258.52,2939.28 4258.52,2931.94 cw(c4218.06,2931.94) 4246.67,2903.33 4183.33,2840 4167.01,2840 4162.01,2845 v2(4160,2845)
DDR_D13: RN10.3 U1.J18 | length 2404.5
  Top Layer w4: v2(3340,4150) 3396.8,4150 RN10.3@3400.5,4153.7
  Top Layer w5: v1(3967.72,2832.76) U1.J18@3983.46,2848.5
  Int1 (Sign) w3: v1(3967.72,2832.76) 3979.96,2845 ; 3984.96,2850 4073.79,2850
  Int1 (Sign) w4: 3979.96,2845 3984.96,2850 ; 4073.79,2850 4105,2850 v2(4115,2860)
  Int6 (Sign) w4: v2(3340,4150) v2@3343.91,4146.09 ; v2@3343.93,4146.07 ccw(c3390,4192.18) 3390,4127 3920.69,4127 3925.58,4127 cw(c3925.58,4043.85) 3971.95,4112.87 ccw(c3974.18,4116.19) 3972.09,4112.78 cw(c3920.69,4027) 3991.4,4097.71 4249.56,3839.56 cw(c4214.68,3804.68) 4264,3804.68 4264,3680.28 4268.71,2934.99 4268.71,2925.43 cw(c4239.57,2925.43) 4260.18,2904.82 4184.36,2829 4146,2829 v2(4115,2860)
DDR_D14: RN10.2 U1.J17 | length 2823.1
  Top Layer w4: v2(3338.75,4186.37) 3341.09,4186.37 RN10.2@3400.5,4186.35
  Top Layer w5: v1(3936.22,2832.76) U1.J17@3951.97,2848.5
  Int1 (Sign) w3: v1(3936.22,2832.76) 3922.22,2818.76 3922.22,2762.78 3932.73,2752.27 4044.65,2752.27 cw(c4044.65,2702.28) 4080,2737.63
  Int1 (Sign) w4: 4080,2737.63 4111.31,2706.31 ccw(c4138.82,2733.82) 4138.82,2694.92 v2(4205.03,2694.92)
  Int6 (Sign) w4: v2(3338.75,4186.37) ccw(c3359.49,4207.12) 3346.47,4180.83 ccw(c3359.49,4207.12) 3356.07,4177.98 ccw(c3356.5,4181.96) 3356.5,4177.96 3448.32,4177.78 ; 3448.33,4177.78 3454.84,4177.78 ccw(c3454.84,4181.78) 3454.92,4177.78 ; 3454.93,4177.78 3460.91,4177.89 3713.1,4182.68 3719.7,4182.81 cw(c3719.85,4174.81) 3719.85,4182.81 4086.38,4182.81 cw(c4086.38,4144.63) 4113.37,4171.63 4250.71,4034.29 cw(c4180,3963.58) 4280,3963.58 4280,3686.9 ; v2(4205.03,2694.92) 4269.71,2759.6 ccw(c4199,2830.31) 4272.48,2762.48 ccw(c4199,2830.31) 4289,2786.72 ccw(c4199,2830.31) 4299,2830.31 4299,2868.64 ccw(c4295,2868.64) 4299,2868.73 4280,3686.86
DDR_D15: RN10.1 U1.J16 | length 3071.7
  Top Layer w4: v2(3345,4230) 3400,4230 RN10.1@3400.5,4230.5
  Top Layer w5: v1(3904.72,2832.76) U1.J16@3920.47,2848.5
  Int3 (Sign) w3: v1(3904.72,2832.76) 3896.92,2824.95 ccw(c3911.86,2810) 3890.72,2810 3890.72,2770.62 ccw(c3906.33,2770.59) 3890.73,2770.23 cw(c3887.73,2770.16) 3890.73,2770.09 ccw(c3904.72,2769.76) 3896.82,2758.21 cw(c3895.13,2755.73) 3896.93,2758.13 ccw(c3906.33,2770.59) 3905.58,2755 3905.66,2755 3932.93,2755 cw(c3932.93,2737.93) 3945,2750 3950,2745 ccw(c3974.14,2769.14) 3974.14,2735 4075.17,2735 cw(c4075.17,2716.99) 4080,2734.34
  Int3 (Sign) w4: 4080,2734.34 cw(c4075.17,2716.99) 4087.9,2729.73 4116.92,2700.7 ; 4116.61,2629.19 cw(c4138.79,2651.36) 4114.45,2631.59 ccw(c4111.34,2629.06) 4113.76,2632.25 cw(c4123.43,2645) 4107.58,2647.18 ccw(c4103.61,2647.73) 4107.59,2648.14 cw(c4138.79,2651.36) 4107.43,2651.36 4107.43,2658.08 cw(c4123.64,2658.08) 4112.17,2669.54 ccw(c4090.84,2690.86) 4121,2690.86 ccw(c4107.08,2690.86) 4116.93,2700.7 ; 4116.63,2629.17 ccw(c4132.1,2644.67) 4132.1,2622.77 v2(4237.48,2622.77)
  Int6 (Sign) w4: v2(3345,4230) 3345.71,4230.71 cw(c3416.42,4160) 3416.42,4260 4013.23,4260 cw(c4013.23,4160) 4083.94,4230.71 4149.82,4164.82 4269.82,4044.82 cw(c4221.11,3996.11) 4290,3996.11 4290,3600.91 ccw(c4294,3600.91) 4290,3600.82 4307,2868.94 cw(c4295,2868.64) 4307,2868.64 4307,2733.71 cw(c4207,2733.71) 4277.71,2663 v2(4237.48,2622.77)
DDR_D\C\A\S\: RN7.3 U1.F16 | length 1533.2
  Top Layer w4: v2(4180,3535.05) 4272.21,3627.26 ccw(c4201.5,3697.97) 4301.5,3697.97 4301.5,3855 4301.5,3868.5 4299.99,3870.01 4298.7,3871.3 RN7.3@4274.5,3871.3 cw(c4274.5,3845.47) RN7.3@4292.77,3863.73
  Top Layer w5: v1(3904.72,2927.24) U1.F16@3920.47,2942.99
  Int4 (Sign) w3: v1(3904.72,2927.24) 3904.72,2922.91 3910,2917.64 3910,2915 3915.25,2909.75 4066.23,2909.75 cw(c4066.23,2867.37) 4080,2907.45
  Int4 (Sign) w4: 4080,2907.45 cw(c4066.23,2867.37) 4096.19,2897.34 4109.81,2883.72 ccw(c4123.5,2892) 4123.5,2876 4136.07,2876 cw(c4136.07,2838.44) 4162.63,2865 ccw(c4186.77,2889.14) 4186.77,2855 4196.31,2855 ccw(c4196.31,2912.18) 4236.73,2871.73 4253.06,2888.06 ccw(c4182.35,2958.77) 4282.35,2958.77 4282.35,3330.12 ; v2@4179.99,3534.99 ccw(c4195.77,3519.23) 4173.47,3519.23 4173.47,3502.88 ccw(c4227.88,3502.88) 4189.41,3464.41 4254.41,3399.41 cw(c4192.62,3337.62) 4278.86,3351.7 ccw(c4282.8,3352.35) 4278.92,3351.42 cw(c4174.35,3324.38) 4282.2,3330.12
DDR_D\C\L\K\E\: RN9.1 U1.B18 | length 1402.5
  Top Layer w5: RN9.1@3189,3746 3189,3730.7 ccw(c3260.7,3730.7) 3210,3680 ccw(c3258.28,3728.28) 3243.52,3661.62 ccw(c3258.28,3728.28) 3258.28,3660 v2(3270.69,3660) ; v1(3967.72,3053.23) U1.B18@3983.46,3068.98
  Int6 (Sign) w3: v1(3967.72,3053.23) 3972.68,3058.2 ccw(c3930.88,3100) 3990,3100 3990,3140
  Int6 (Sign) w4: 3308.04,3540.94 ccw(c3366.56,3599.46) 3366.56,3516.7 3685.13,3516.7 ccw(c3685.13,3607.91) 3734.3,3531.09 ccw(c3685.13,3607.91) 3744.28,3538.47 cw(c3764.06,3501.33) 3764.06,3543.41 3845,3543.41 cw(c3845,3503.37) 3873.32,3531.68 3955.63,3449.37 cw(c3952.8,3446.54) 3955.72,3449.28 3977.62,3426.2 cw(c3947.05,3395.63) 3990.29,3395.63 3990.29,3366.91 3989.96,3353.34 3989.96,3350.03 cw(c3986,3349.45) 3990,3349.47 3990,3140
  Int6 (Sign) w5: v2(3270.69,3660) cw(c3236.13,3625.44) 3282.31,3641.43 cw(c3236.13,3625.44) 3285,3625.44 3285,3585 ccw(c3335.75,3585) 3299.86,3549.12 3308.04,3540.94
DDR_D\C\S\0\: RN4.4 U1.C19 | length 875.7
  Top Layer w4: RN4.4@4074.5,3800.5 4134.5,3800.5 4135,3800 v2(4136,3800)
  Top Layer w5: U1.C19@4014.96,3037.48 4030.84,3053.36 4030.84,3106.59 v2(4059.5,3135.25)
  Int3 (Sign) w4: v2(4059.5,3135.25) 4059.5,3714.64 cw(c4095.36,3714.64) 4061.04,3725.04 cw(c4095.36,3714.64) 4069.98,3739.98 4125.76,3795.76 cw(c4136,3785.51) v2(4136,3800)
DDR_D\R\A\S\: RN7.1 U1.E17 | length 1091.9
  Top Layer w4: v2(4185,3570) 4245.21,3630.21 ccw(c4174.5,3700.92) 4274.5,3700.92 RN7.1@4274.5,3794.5
  Top Layer w5: v1(3936.3,2958.7) 3936.39,2958.8 U1.E17@3951.97,2974.49
  Int1 (Sign) w4: v2(4185,3570) cw(c4129.47,3514.47) 4208,3514.47 4208,3094.52 cw(c4153.55,3094.52) 4198.93,3064.43 cw(c4153.55,3094.52) v2(4192.05,3056.02)
  Int3 (Sign) w3: v1(3936.3,2958.7) 3936.37,2958.78 3939.23,2961.75 cw(c3970,2930.96) 3970,2974.49 4035.5,2974.49 ccw(c4035.5,3009.5) 4060.23,2984.72 ; 4060.26,2984.74 4080,3004.49
  Int3 (Sign) w4: 4080,3004.49 cw(c4104.76,2979.73) 4104.76,3014.74 ccw(c4104.76,3050.92) 4130.34,3025.34 4149.06,3044.06 cw(c4175.52,3017.54) 4175.52,3055 4191.04,3055 v2(4192.05,3056.02)
DDR_D\W\R\: RN7.2 U1.E18 | length 1177.4
  Top Layer w4: v2(4195,3605) 4210.71,3620.71 ccw(c4140,3691.42) 4240,3691.42 4240,3815 cw(c4264.14,3815) 4247.07,3832.07 4250,3835 4270.85,3835 RN7.2@4274.5,3838.65
  Top Layer w5: v1(3967.72,2958.74) U1.E18@3983.46,2974.49 ; v2(4112.63,2997.37) 4112.63,2998.57 4115.56,3001.5 4159.44,3001.5 4174.63,2986.31 4177.06,2986.31 v2(4180.07,2986.77)
  Int1 (Sign) w3: v1(3967.72,2958.74) ccw(c4000.89,2991.91) 4000.89,2945 4020,2945 ccw(c4020,2993.77) 4054.46,2959.26 ; 4054.49,2959.28 4080,2984.8
  Int1 (Sign) w5: 4080,2984.8 4092.57,2997.37 v2(4112.63,2997.37) ; v2(4180.07,2986.77) 4202.02,3008.51 ccw(c4198.51,3012.07) 4202.22,3008.72 ; v2(4195,3605) cw(c4143.09,3553.09) 4216.5,3553.09 4216.5,3040.03 cw(c4176.21,3040.03) 4204.7,3011.54 4202.24,3008.74
DDR_DCLK0_N: U1.E16 U2.G3 | length 1710.6
  Top Layer w15: U2.G3@3689.02,3986.89 3689.59,3986.32 3713.68,3986.32 v2(3715,3985) ; v1(3904.72,2958.74) U1.E16@3920.47,2974.49
  Int4 (Sign) w3: v1(3904.72,2958.74) 3909.05,2958.74 3924.84,2974.53 3949.95,2974.53 3955.6,2980.19 3990,2980.19
  Int4 (Sign) w15: v2(3715,3985) 3726.75,3973.25 ccw(c3797.46,4043.96) 3797.46,3943.96 3917.54,3943.96 cw(c3917.54,3843.96) 3988.25,3914.67 4044.16,3858.75 cw(c3985.41,3800) 4068.5,3800 4068.5,3410.69 ccw(c4090.69,3410.69) 4075,3395 ccw(c4115.29,3435.29) 4115.29,3378.31 4183.36,3378.31 cw(c4183.36,3337.43) 4197.33,3375.85 cw(c4183.36,3337.43) 4212.24,3366.36 4218.36,3360.24 cw(c4158.11,3300) 4243.31,3300 4243.31,3255 cw(c4167.36,3255) 4221.08,3201.31 ; 3990,2980.19 ccw(c3990,3004.79) 4007.39,2987.39 4020,3000 4020,3115 cw(c4090.82,3115) 4024.56,3140 cw(c4090.82,3115) 4040.74,3165.08 4045.23,3169.57 cw(c4093.3,3081.88) 4070.99,3179.36 cw(c4093.3,3081.88) 4093.3,3181.88 4171.55,3181.88 ccw(c4171.55,3263.13) 4213.05,3193.28 4221.07,3201.3
DDR_DCLK0_P: U1.D16 U2.G2 | length 1765.1
  Top Layer w15: v2(3635,3995) 3642.54,3987.46 3656.95,3987.46 U2.G2@3657.52,3986.89 ; v1(3904.83,2990.11) 3906.02,2991.31 3906.02,2991.53 U1.D16@3920.47,3005.98
  Int4 (Sign) w3: v1(3904.83,2990.11) ccw(c3904.83,3000.57) 3912.21,2993.17 3915.11,2996.07 cw(c3934.82,2976.36) 3934.82,3004.24 3940.6,3004.24 cw(c3940.6,2990.3) 3950.44,3000.16 ccw(c3962.89,3012.6) 3962.89,2995 3975.54,2995 ccw(c3975.54,3010.72) 3986.66,2999.61 3993.19,3006.14
  Int4 (Sign) w15: v2(3635,3995) 3697.19,3932.81 ccw(c3735,3970.62) 3735,3917.15 3906.43,3917.15 cw(c3906.43,3817.15) 3977.14,3887.86 4017.5,3847.5 cw(c3959.1,3789.1) 4041.69,3789.1 4041.69,3407.14 ; 3993.19,3006.14 3993.19,3125.71 cw(c4063.9,3125.71) 3994.65,3140 cw(c4063.9,3125.71) 4013.9,3175.71 cw(c4084.61,3105) 4071.55,3204.14 cw(c4084.61,3105) 4084.61,3205 4169.48,3205 ccw(c4169.48,3255.52) 4205.17,3219.77 ; 4060,3375 4051.46,3383.54 cw(c4075.06,3407.14) 4041.69,3407.14 ; 4205.2,3219.8 ccw(c4177.93,3247.07) 4216.5,3247.07 4216.5,3310 ccw(c4180.29,3310) 4205.89,3335.61 4197.95,3343.55 ccw(c4178.76,3324.37) 4178.76,3351.5 4123.89,3351.5 cw(c4123.89,3451.5) 4053.18,3380.79 4045.87,3388.09 cw(c4087.14,3407.14) 4041.69,3407.14
DDR_DQM0: RN7.4 U1.G20 | length 1277.7
  Top Layer w5: U1.G20@4046.46,2911.5 4047.45,2910.5 4094.44,2910.5 4101.44,2917.5 4168.91,2917.5 4189.3,2937.89 4202.11,2937.89 4202.52,2937.48 v2(4202.77,2937.48) ; v2(4239,3960) 4241.87,3957.13 4252.31,3957.13 4258,3951.44 4258,3932 RN7.4@4274.5,3915.5
  Int1 (Sign) w5: v2@4202.2,2938.06 4242.07,2977.93 ccw(c4209.65,3010.35) 4255.5,3010.35 4255.5,3674.61 4254,3896.29 4253.71,3899.95 ccw(c4161.06,3892.56) 4251.06,3915.75 4239.94,3959.06 4239.89,3959.11 v2(4239,3960)
DDR_DQM1: RN9.3 U1.H19 | length 1925
  Top Layer w5: RN9.3@3265.8,3746 3270.69,3741.11 v2(3270.69,3715) ; U1.H19@4014.96,2880 4032.96,2898 4051.73,2898 4054.73,2901 4097.67,2901 4105.17,2908.5 4151.5,2908.5 v2(4167.37,2892.63)
  Int3 (Sign) w5: v2(4140,3095) 4170,3095 4192.48,3072.52 4198.89,3072.52 4206.4,3065 4206.5,3065
  Int4 (Sign) w5: 4096.27,2925.8 cw(c4135.54,2965.08) 4096.21,2925.86 cw(c4135.54,2965.08) 4080,2965.08 4080,2988.08 cw(c4108.78,2988.08) 4088.43,3008.43 4095,3015 cw(c4112.47,2997.53) 4112.47,3022.23 4126.71,3022.23 ccw(c4126.71,3049.03) 4145.65,3030.08 ccw(c4126.71,3049.03) 4153.5,3049.03 4153.5,3062.41 ccw(c4107.41,3062.41) v2(4140,3095) ; 4096.29,2925.78 ccw(c4122.35,2951.89) 4122.35,2915 4140.22,2915 cw(c4140.22,2891.38) 4156.92,2908.08 4163.84,2901.16 cw(c4155.3,2892.63) v2(4167.37,2892.63)
  Int6 (Sign) w5: v2(3270.69,3715) 3275,3715 3365,3625 3943.7,3625 cw(c3943.7,3593.7) 3965.83,3615.83 4125.71,3455.95 cw(c4055,3385.24) 4155,3385.24 4155,3131.21 cw(c4103.79,3131.21) v2(4140,3095)
DDR_DQS0: R3.1 U1.F20 | length 199.5
  Top Layer w5: U1.F20@4046.46,2942.99 4047.98,2942.99 4056.47,2934.5 4116.17,2934.5 4138.17,2956.5 4215.98,2956.5 4218.17,2954.31 4219.94,2954.31 4227.48,2946.77 R3.1@4227.48,2945
DDR_DQS1: R4.1 U1.H18 | length 297.4
  Top Layer w4: v2(4073,2865) 4075,2865 4086,2876 4121.63,2876 4126.13,2871.5 4168.87,2871.5 4179,2881.63 4188.37,2891 4211.48,2891 4212.67,2889.81 4214.44,2889.81 4222.48,2881.77 R4.1@4222.48,2880
  Top Layer w5: v1(3967.72,2864.25) U1.H18@3983.46,2880
  Int1 (Sign) w3: v1(3967.72,2864.25) 3968.09,2864.63 4072.63,2864.63 v2(4073,2865)
DDR_RES_A0: RN1.8 U2.K7 | length 244.6
  Top Layer w4: RN1.8@3804.5,3664.5 3799,3664.5 3765,3698.5 3765,3818.78 U2.K7@3815,3868.78
DDR_RES_A1: RN1.6 U2.L8 | length 191.8
  Top Layer w4: U2.L8@3846.5,3829.41 3846.5,3828.38 3831.5,3813.38 3831.5,3783.5 3881.35,3733.65 RN1.6@3881.35,3664.5
DDR_RES_A2: RN1.7 U2.L7 | length 229.9
  Top Layer w4: U2.L7@3815,3829.41 3780,3794.41 3780,3725 3789,3716 3826.63,3716 3848.7,3693.93 RN1.7@3848.7,3664.5
DDR_RES_A3: RN1.5 U2.M8 | length 158.3
  Top Layer w4: U2.M8@3846.5,3790.04 3925.5,3711.04 RN1.5@3925.5,3664.5
DDR_RES_A4: RN2.8 U2.M2 | length 124.7
  Top Layer w4: RN2.8@3589.5,3694.5 3590,3694 3590,3722.52 U2.M2@3657.52,3790.04
DDR_RES_A5: RN2.6 U2.L3 | length 165.8
  Top Layer w4: RN2.6@3666.35,3694.5 3677.35,3705.5 3677.35,3722.35 3715,3760 3715,3803.43 U2.L3@3689.02,3829.41
DDR_RES_A6: RN2.7 U2.L2 | length 160.3
  Top Layer w4: RN2.7@3633.7,3694.5 3630,3698.2 3630,3725 3672.52,3767.52 3672.52,3797.22 3657.52,3812.22 U2.L2@3657.52,3829.41
DDR_RES_A7: RN2.5 U2.K3 | length 206.4
  Top Layer w4: U2.K3@3689.02,3868.78 3689.02,3855.98 3735,3810 3735,3719 3732.49,3716.49 3732.49,3711.5 3715.49,3694.5 RN2.5@3710.5,3694.5
DDR_RES_A8: RN3.5 U2.K2 | length 277.7
  Top Layer w4: RN3.5@3469.5,3689.5 3475,3695 3510,3695 3554.37,3739.37 3554.37,3765.63 U2.K2@3657.52,3868.78
DDR_RES_A9: RN3.6 U2.J3 | length 291.8
  Top Layer w4: RN3.6@3469.5,3733.65 3498.61,3733.65 3648.74,3883.78 3664.65,3883.78 U2.J3@3689.02,3908.15
DDR_RES_A10: RN4.8 U2.K8 | length 271
  Top Layer w4: U2.K8@3846.5,3868.78 3846.5,3868.5 3930,3785 3930,3745 3985,3690 4005,3690 RN4.8@4015.5,3679.5
DDR_RES_A11: RN3.7 U2.J2 | length 247.5
  Top Layer w4: RN3.7@3469,3765.8 3515.17,3765.8 U2.J2@3657.52,3908.15
DDR_RES_A12: RN3.8 U2.H2 | length 245.5
  Top Layer w4: RN3.8@3469,3810 3484,3825 3535,3825 U2.H2@3657.52,3947.52
DDR_RES_BA0: RN4.6 U2.J8 | length 251.9
  Top Layer w4: U2.J8@3846.5,3908.15 3849.17,3905.47 3849.17,3900.83 3960,3790 3960,3765 3970,3755 4004.15,3755 RN4.6@4005.5,3756.35 ; RN4.6@4005.5,3760 4011.85,3760 RN4.6@4015.5,3756.35
DDR_RES_BA1: RN4.7 U2.J7 | length 295.3
  Top Layer w4: U2.J7@3815,3908.15 3832.92,3890.23 3846.26,3890.23 3943.6,3792.89 3943.6,3761.4 3981.3,3723.7 RN4.7@4015.5,3723.7
DDR_RES_D0: RN5.5 U2.A8 | length 194.6
  Top Layer w4: U2.A8@3846.5,4223.11 3876.89,4253.5 3999,4253.5 4016,4270.5 RN5.5@4016,4276
DDR_RES_D1: RN5.7 U2.B9 | length 145.1
  Top Layer w4: U2.B9@3877.99,4183.74 3958.74,4183.74 3975,4200 4015.2,4200 RN5.7@4016,4199.2
DDR_RES_D2: RN5.6 U2.B7 | length 220.9
  Top Layer w4: U2.B7@3815,4183.74 3831.26,4200 3910,4200 3941.85,4231.85 RN5.6@4016,4231.85
DDR_RES_D3: RN5.8 U2.C9 | length 143.7
  Top Layer w4: U2.C9@3877.99,4144.37 3879.55,4142.81 4003.81,4142.81 RN5.8@4016,4155
DDR_RES_D4: RN6.5 U2.C7 | length 233.1
  Top Layer w4: U2.C7@3815,4144.37 3818.44,4144.37 3842.81,4120 3920,4120 3965,4075 4007.85,4075 RN6.5@4016,4066.85
DDR_RES_D5: RN6.6 U2.D9 | length 172.1
  Top Layer w4: U2.D9@3877.99,4105 3907.63,4105 3989.93,4022.7 RN6.6@4016,4022.7
DDR_RES_D6: RN6.7 U2.D7 | length 248.6
  Top Layer w4: U2.D7@3815,4105 3818.44,4105 3841.44,4082 3885.37,4082 3977.32,3990.05 RN6.7@4016,3990.05
DDR_RES_D7: RN6.8 U2.E9 | length 187.6
  Top Layer w4: U2.E9@3877.99,4065.63 3993.34,3950.28 4011.57,3950.28 RN6.8@4016,3945.85
DDR_RES_D8: RN8.5 U2.E1 | length 239.8
  Top Layer w4: RN8.5@3469.5,3899.5 3485,3915 3500,3915 3590,4005 3590,4029.61 U2.E1@3626.02,4065.63
DDR_RES_D9: RN8.6 U2.D3 | length 286.3
  Top Layer w4: RN8.6@3469.5,3943.65 3478.83,3952.98 3492.16,3952.98 3619.81,4080.63 3664.65,4080.63 U2.D3@3689.02,4105
DDR_RES_D10: RN8.7 U2.D1 | length 209.8
  Top Layer w4: RN8.7@3469.5,3976.3 3475.36,3982.16 3492.16,3982.16 3613.91,4103.91 3624.93,4103.91 U2.D1@3626.02,4105
DDR_RES_D11: RN8.8 U2.C3 | length 270.8
  Top Layer w4: RN8.8@3469.5,4020.5 3500.5,4020.5 3603.35,4123.35 3664.55,4123.35 3685.58,4144.37 U2.C3@3689.02,4144.37
DDR_RES_D12: RN10.5 U2.C1 | length 174.7
  Top Layer w4: RN10.5@3469.5,4109.5 3474,4105 3555,4105 3594.37,4144.37 U2.C1@3626.02,4144.37
DDR_RES_D13: RN10.6 U2.B3 | length 232
  Top Layer w4: RN10.6@3469.5,4153.65 3498.65,4153.65 3505,4160 3665.28,4160 U2.B3@3689.02,4183.74
DDR_RES_D14: RN10.7 U2.B1 | length 158.2
  Top Layer w4: RN10.7@3469.5,4186.3 3472.8,4183 3625.28,4183 U2.B1@3626.02,4183.74
DDR_RES_D15: RN10.8 U2.A2 | length 197.4
  Top Layer w4: RN10.8@3469.5,4230.5 3558.81,4230.5 3566.42,4238.11 3642.52,4238.11 U2.A2@3657.52,4223.11
DDR_RES_D\C\A\S\: RN7.6 U2.G8 | length 406.9
  Top Layer w4: U2.G8@3846.5,3986.89 3873.11,3986.89 3965,3895 4155,3895 4175,3875 4201.85,3875 RN7.6@4205.5,3871.35
DDR_RES_D\C\L\K\E\: RN9.8 U2.H3 | length 632.6
  Top Layer w4: RN9.8@3189,3815 3194,3820 3194,3921.63 3209.4,3937.03 3222.03,3937.03 v3(3245,3960) ; v3(3625,3965) 3671.54,3965 U2.H3@3689.02,3947.52
  Int1 (Sign) w4: v3(3245,3960) cw(c3281.21,3923.79) 3281.21,3975 3596.32,3975 cw(c3596.32,3936.32) 3615.13,3970.12 cw(c3596.32,3936.32) v3@3623.67,3963.67
DDR_RES_D\C\S\0\: RN4.5 U2.H8 | length 238.1
  Top Layer w4: U2.H8@3846.5,3947.52 3846.5,3933.5 3970,3810 4006,3810 RN4.5@4015.5,3800.5
DDR_RES_D\R\A\S\: RN7.8 U2.H7 | length 466.3
  Top Layer w4: U2.H7@3815,3947.52 3830,3962.52 3861.17,3962.52 3974.34,3849.34 4090.66,3849.34 4124,3816 4184,3816 RN7.8@4205.5,3794.5
DDR_RES_D\W\R\: RN7.7 U2.G7 | length 459.1
  Top Layer w4: U2.G7@3815,3986.89 3831.37,3970.52 3864.48,3970.52 3971.32,3863.68 4094.61,3863.68 4128.29,3830 4196.8,3830 RN7.7@4205.5,3838.7
DDR_RES_DQM0: RN7.5 U2.F7 | length 440.9
  Top Layer w4: U2.F7@3815,4026.26 3839.37,4001.89 3883.11,4001.89 3975,3910 4200,3910 RN7.5@4205.5,3915.5